# Altium PCB IMX8MMLPD4-CPU2_FULLY_PREPLACED_FANOUT.PcbDoc (part 2 of 3)
Units mil, origin at the board's own origin, x right, y up, seen from the top; angles counter-clockwise.
Board outline 2729.93 x 2000.03 mil, 8 copper layers (L1_PS, L2_GND_1, L3_IN1, L4_GND_2, L5_PWR_1, L6_PWR_2, L7_GND_3, L8_SS), stack 46.1 mil thick; 228 components, 321 nets, 1593 pads, 372 vias.
Unrouted connection lines stored in the file: 857.
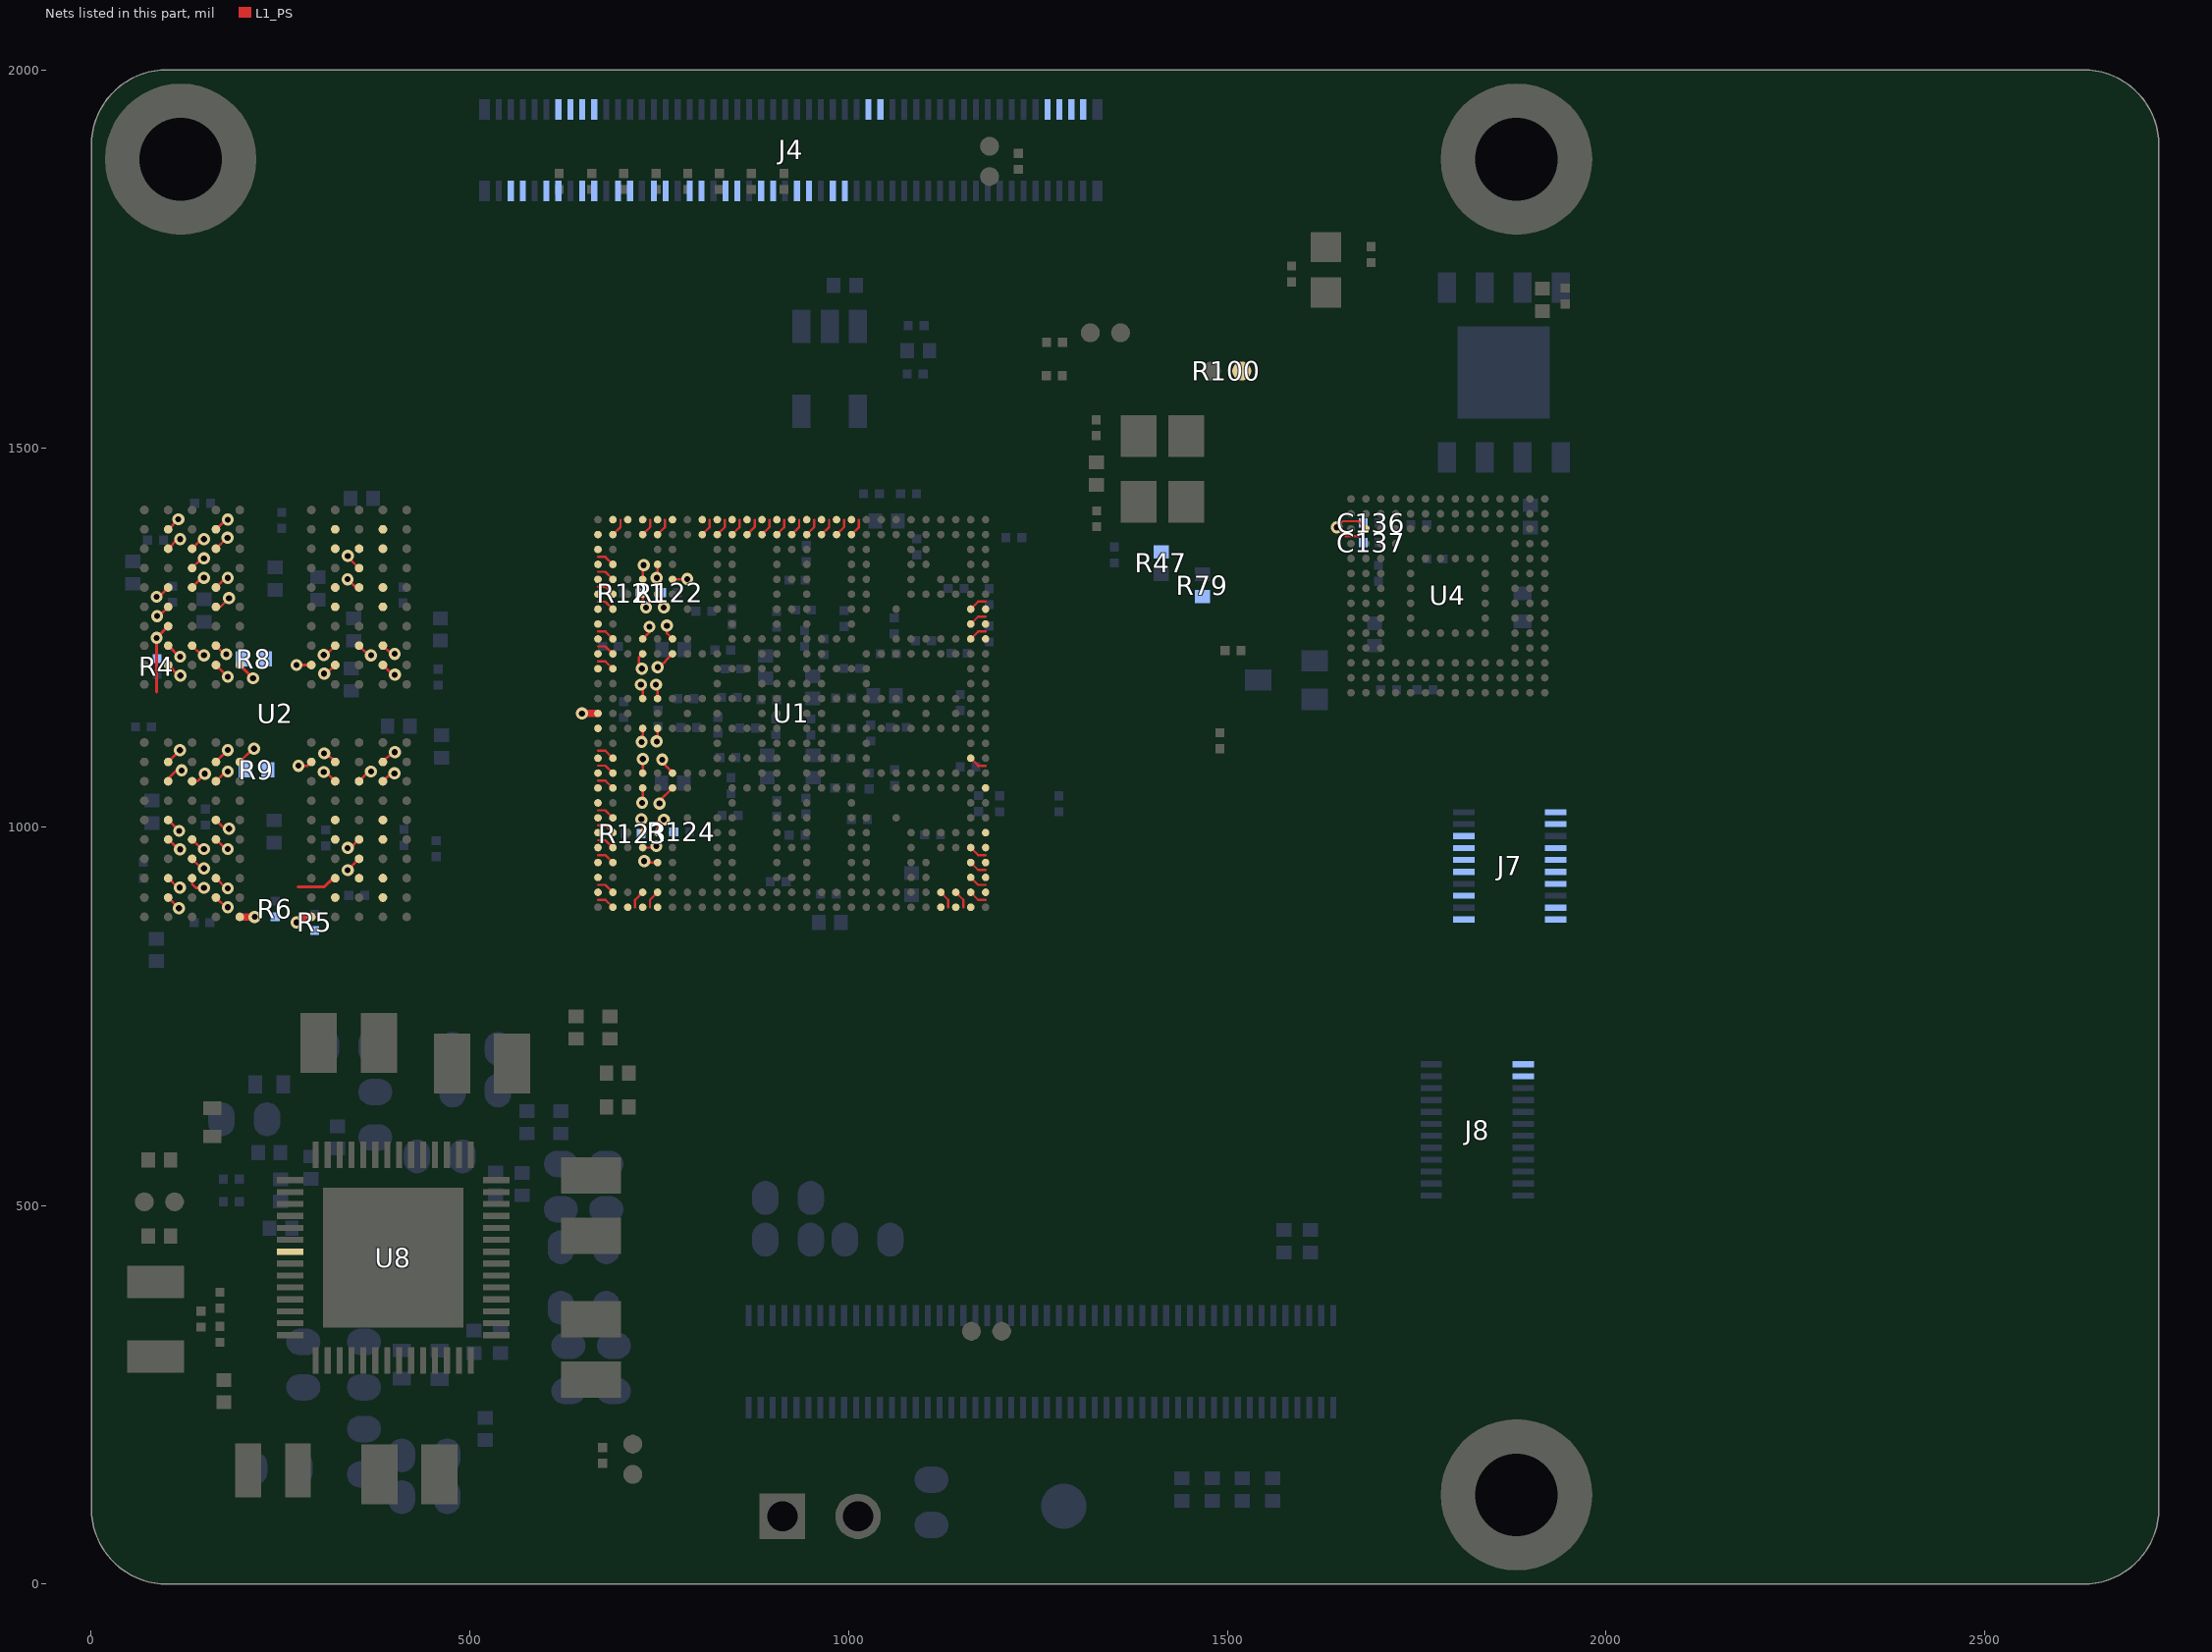
[diagram p4: the nets of this part, all layers, seen from the top]

## Footprints (in the part's own frame and the unit in brackets; to place one, negate y for a bottom-side part, rotate by r counter-clockwise, add the part's x,y. Pads: shape width x height; smd on the part's side, far side on the other; paste and mask are expansions set on the pad) (continued)
con100_0p4_22p8x3p1_sm [mil] "CON100_0P4_22P8X3P1_SM"
  rect 8x28 smd: 1(-385.83,-60.63) 2(-385.83,60.63) 3(-370.08,-60.63) 4(-370.08,60.63) 5(-354.33,-60.63) 6(-354.33,60.63) 7(-338.58,-60.63) 8(-338.58,60.63) 9(-322.83,-60.63) 10(-322.83,60.63) 11(-307.09,-60.63) 12(-307.09,60.63) 13(-291.34,-60.63) 14(-291.34,60.63) 15(-275.59,-60.63) 16(-275.59,60.63) 17(-259.84,-60.63) 18(-259.84,60.63) 19(-244.09,-60.63) 20(-244.09,60.63) 21(-228.35,-60.63) 22(-228.35,60.63) 23(-212.6,-60.63) 24(-212.6,60.63) 25(-196.85,-60.63) 26(-196.85,60.63) 27(-181.1,-60.63) 28(-181.1,60.63) 29(-165.35,-60.63) 30(-165.35,60.63) 31(-149.61,-60.63) 32(-149.61,60.63) 33(-133.86,-60.63) 34(-133.86,60.63) 35(-118.11,-60.63) 36(-118.11,60.63) 37(-102.36,-60.63) 38(-102.36,60.63) 39(-86.61,-60.63) 40(-86.61,60.63) 41(-70.87,-60.63) 42(-70.87,60.63) 43(-55.12,-60.63) 44(-55.12,60.63) 45(-39.37,-60.63) 46(-39.37,60.63) 47(-23.62,-60.63) 48(-23.62,60.63) 49(-7.87,-60.63) 50(-7.87,60.63) 51(7.87,-60.63) 52(7.87,60.63) 53(23.62,-60.63) 54(23.62,60.63) 55(39.37,-60.63) 56(39.37,60.63) 57(55.12,-60.63) 58(55.12,60.63) 59(70.87,-60.63) 60(70.87,60.63) 61(86.61,-60.63) 62(86.61,60.63) 63(102.36,-60.63) 64(102.36,60.63) 65(118.11,-60.63) 66(118.11,60.63) 67(133.86,-60.63) 68(133.86,60.63) 69(149.61,-60.63) 70(149.61,60.63) 71(165.35,-60.63) 72(165.35,60.63) 73(181.1,-60.63) 74(181.1,60.63) 75(196.85,-60.63) 76(196.85,60.63) 77(212.6,-60.63) 78(212.6,60.63) 79(228.35,-60.63) 80(228.35,60.63) 81(244.09,-60.63) 82(244.09,60.63) 83(259.84,-60.63) 84(259.84,60.63) 85(275.59,-60.63) 86(275.59,60.63) 87(291.34,-60.63) 88(291.34,60.63) 89(307.09,-60.63) 90(307.09,60.63) 91(322.83,-60.63) 92(322.83,60.63) 93(338.58,-60.63) 94(338.58,60.63) 95(354.33,-60.63) 96(354.33,60.63) 97(370.08,-60.63) 98(370.08,60.63) 99(385.83,-60.63) 100(385.83,60.63)
  L1_PS keep-out region: -122.11,46.63 -122.11,29.53 -114.11,29.53 -114.11,46.63
  L1_PS keep-out region: -106.36,46.63 -106.36,29.53 -98.36,29.53 -98.36,46.63
  L1_PS keep-out region: -90.61,46.63 -90.61,29.53 -82.61,29.53 -82.61,46.63
  L1_PS keep-out region: -74.87,46.63 -74.87,29.53 -66.87,29.53 -66.87,46.63
  L1_PS keep-out region: -59.12,46.63 -59.12,29.53 -51.12,29.53 -51.12,46.63
  L1_PS keep-out region: -43.37,46.63 -43.37,29.53 -35.37,29.53 -35.37,46.63
  L1_PS keep-out region: -27.62,46.63 -27.62,29.53 -19.62,29.53 -19.62,46.63
  L1_PS keep-out region: -11.87,46.63 -11.87,29.53 -3.87,29.53 -3.87,46.63
  L1_PS keep-out region: 3.87,46.63 3.87,29.53 11.87,29.53 11.87,46.63
  L1_PS keep-out region: 19.62,46.63 19.62,29.53 27.62,29.53 27.62,46.63
  L1_PS keep-out region: 35.37,46.63 35.37,29.53 43.37,29.53 43.37,46.63
  L1_PS keep-out region: 51.12,46.63 51.12,29.53 59.12,29.53 59.12,46.63
  L1_PS keep-out region: 66.87,46.63 66.87,29.53 74.87,29.53 74.87,46.63
  L1_PS keep-out region: 82.61,46.63 82.61,29.53 90.61,29.53 90.61,46.63
  L1_PS keep-out region: 114.11,46.63 114.11,29.53 122.11,29.53 122.11,46.63
  L1_PS keep-out region: 98.36,46.63 98.36,29.53 106.36,29.53 106.36,46.63
  L1_PS keep-out region: 129.86,46.63 129.86,29.53 137.86,29.53 137.86,46.63
  L1_PS keep-out region: 145.61,46.63 145.61,29.53 153.61,29.53 153.61,46.63
  L1_PS keep-out region: 177.1,46.63 177.1,29.53 185.1,29.53 185.1,46.63
  L1_PS keep-out region: 161.35,46.63 161.35,29.53 169.35,29.53 169.35,46.63
  L1_PS keep-out region: 192.85,46.63 192.85,29.53 200.85,29.53 200.85,46.63
  L1_PS keep-out region: 208.6,46.63 208.6,29.53 216.6,29.53 216.6,46.63
  L1_PS keep-out region: 224.35,46.63 224.35,29.53 232.35,29.53 232.35,46.63
  L1_PS keep-out region: -311.09,-29.53 -311.09,-46.63 -303.09,-46.63 -303.09,-29.53
  L1_PS keep-out region: -311.09,46.63 -311.09,29.53 -303.09,29.53 -303.09,46.63
  L1_PS keep-out region: -295.34,-29.53 -295.34,-46.63 -287.34,-46.63 -287.34,-29.53
  L1_PS keep-out region: -295.34,46.63 -295.34,29.53 -287.34,29.53 -287.34,46.63
  L1_PS keep-out region: -279.59,-29.53 -279.59,-46.63 -271.59,-46.63 -271.59,-29.53
  L1_PS keep-out region: -279.59,46.63 -279.59,29.53 -271.59,29.53 -271.59,46.63
  L1_PS keep-out region: -263.84,-29.53 -263.84,-46.63 -255.84,-46.63 -255.84,-29.53
  L1_PS keep-out region: -248.09,46.63 -248.09,29.53 -240.09,29.53 -240.09,46.63
  L1_PS keep-out region: -263.84,46.63 -263.84,29.53 -255.84,29.53 -255.84,46.63
  L1_PS keep-out region: -232.35,46.63 -232.35,29.53 -224.35,29.53 -224.35,46.63
  L1_PS keep-out region: -216.6,46.63 -216.6,29.53 -208.6,29.53 -208.6,46.63
  L1_PS keep-out region: -185.1,46.63 -185.1,29.53 -177.1,29.53 -177.1,46.63
  L1_PS keep-out region: -200.85,46.63 -200.85,29.53 -192.85,29.53 -192.85,46.63
  L1_PS keep-out region: -169.35,46.63 -169.35,29.53 -161.35,29.53 -161.35,46.63
  L1_PS keep-out region: -153.61,46.63 -153.61,29.53 -145.61,29.53 -145.61,46.63
  L1_PS keep-out region: -137.86,46.63 -137.86,29.53 -129.86,29.53 -129.86,46.63
  L1_PS keep-out region: 240.09,46.63 240.09,29.53 248.09,29.53 248.09,46.63
  L1_PS keep-out region: 255.84,46.63 255.84,29.53 263.84,29.53 263.84,46.63
  L1_PS keep-out region: 271.59,46.63 271.59,29.53 279.59,29.53 279.59,46.63
  L1_PS keep-out region: 287.34,46.63 287.34,29.53 295.34,29.53 295.34,46.63
  L1_PS keep-out region: 303.09,46.63 303.09,29.53 311.09,29.53 311.09,46.63
  L1_PS keep-out region: -374.08,46.63 -374.08,29.53 -366.08,29.53 -366.08,46.63
  L1_PS keep-out region: -389.83,46.63 -389.83,29.53 -381.83,29.53 -381.83,46.63
  L1_PS keep-out region: -358.33,46.63 -358.33,29.53 -350.33,29.53 -350.33,46.63
  L1_PS keep-out region: -342.58,46.63 -342.58,29.53 -334.58,29.53 -334.58,46.63
  L1_PS keep-out region: -326.83,46.63 -326.83,29.53 -318.83,29.53 -318.83,46.63
  L1_PS keep-out region: 334.58,46.63 334.58,29.53 342.58,29.53 342.58,46.63
  L1_PS keep-out region: 318.83,46.63 318.83,29.53 326.83,29.53 326.83,46.63
  L1_PS keep-out region: 350.33,46.63 350.33,29.53 358.33,29.53 358.33,46.63
  L1_PS keep-out region: 366.08,46.63 366.08,29.53 374.08,29.53 374.08,46.63
  L1_PS keep-out region: 381.83,46.63 381.83,29.53 389.83,29.53 389.83,46.63
  L1_PS keep-out region: -374.08,-29.53 -374.08,-46.63 -366.08,-46.63 -366.08,-29.53
  L1_PS keep-out region: -389.83,-29.53 -389.83,-46.63 -381.83,-46.63 -381.83,-29.53
  L1_PS keep-out region: -358.33,-29.53 -358.33,-46.63 -350.33,-46.63 -350.33,-29.53
  L1_PS keep-out region: -326.83,-29.53 -326.83,-46.63 -318.83,-46.63 -318.83,-29.53
  L1_PS keep-out region: -342.58,-29.53 -342.58,-46.63 -334.58,-46.63 -334.58,-29.53
  silkscreen extent -456,-69 456,69, body extent -445,-67 445,67, height 58
dfn8_1p27_6x5mm_3p1 [mil] "DFN8_1P27_6X5MM_3P1"
  rect 40x24 smd: 1(-112.2,75) 2(-112.2,25) 3(-112.2,-25) 4(-112.2,-75) 5(112.2,-75) 6(112.2,-25) 7(112.2,25) 8(112.2,75)
  rect 122x122 smd paste-99999 mask+0: 9(0,0)
  silkscreen extent -127,-107 127,107, body extent -119,-101 121,100, height 31
fbga153_0p5_11p5x13 [mil] "FBGA153_0P5_11P5X13"
  round 10 smd: A1(-127.95,127.95) A2(-108.27,127.95) A3(-88.58,127.95) A4(-68.9,127.95) A5(-49.21,127.95) A6(-29.53,127.95) A7(-9.84,127.95) A8(9.84,127.95) A9(29.53,127.95) A10(49.21,127.95) A11(68.9,127.95) A12(88.58,127.95) A13(108.27,127.95) A14(127.95,127.95) B1(-127.95,108.27) B2(-108.27,108.27) B3(-88.58,108.27) B4(-68.9,108.27) B5(-49.21,108.27) B6(-29.53,108.27) B7(-9.84,108.27) B8(9.84,108.27) B9(29.53,108.27) B10(49.21,108.27) B11(68.9,108.27) B12(88.58,108.27) B13(108.27,108.27) B14(127.95,108.27) C1(-127.95,88.58) C2(-108.27,88.58) C3(-88.58,88.58) C4(-68.9,88.58) C5(-49.21,88.58) C6(-29.53,88.58) C7(-9.84,88.58) C8(9.84,88.58) C9(29.53,88.58) C10(49.21,88.58) C11(68.9,88.58) C12(88.58,88.58) C13(108.27,88.58) C14(127.95,88.58) D1(-127.95,68.9) D2(-108.27,68.9) D3(-88.58,68.9) D4(-68.9,68.9) D12(88.58,68.9) D13(108.27,68.9) D14(127.95,68.9) E1(-127.95,49.21) E2(-108.27,49.21) E3(-88.58,49.21) E5(-49.21,49.21) E6(-29.53,49.21) E7(-9.84,49.21) E8(9.84,49.21) E9(29.53,49.21) E10(49.21,49.21) E12(88.58,49.21) E13(108.27,49.21) E14(127.95,49.21) F1(-127.95,29.53) F2(-108.27,29.53) F3(-88.58,29.53) F5(-49.21,29.53) F10(49.21,29.53) F12(88.58,29.53) F13(108.27,29.53) F14(127.95,29.53) G1(-127.95,9.84) G2(-108.27,9.84) G3(-88.58,9.84) G5(-49.21,9.84) G10(49.21,9.84) G12(88.58,9.84) G13(108.27,9.84) G14(127.95,9.84) H1(-127.95,-9.84) H2(-108.27,-9.84) H3(-88.58,-9.84) H5(-49.21,-9.84) H10(49.21,-9.84) H12(88.58,-9.84) H13(108.27,-9.84) H14(127.95,-9.84) J1(-127.95,-29.53) J2(-108.27,-29.53) J3(-88.58,-29.53) J5(-49.21,-29.53) J10(49.21,-29.53) J12(88.58,-29.53) J13(108.27,-29.53) J14(127.95,-29.53) K1(-127.95,-49.21) K2(-108.27,-49.21) K3(-88.58,-49.21) K5(-49.21,-49.21) K6(-29.53,-49.21) K7(-9.84,-49.21) K8(9.84,-49.21) K9(29.53,-49.21) K10(49.21,-49.21) K12(88.58,-49.21) K13(108.27,-49.21) K14(127.95,-49.21) L1(-127.95,-68.9) L2(-108.27,-68.9) L3(-88.58,-68.9) L12(88.58,-68.9) L13(108.27,-68.9) L14(127.95,-68.9) M1(-127.95,-88.58) M2(-108.27,-88.58) M3(-88.58,-88.58) M4(-68.9,-88.58) M5(-49.21,-88.58) M6(-29.53,-88.58) M7(-9.84,-88.58) M8(9.84,-88.58) M9(29.53,-88.58) M10(49.21,-88.58) M11(68.9,-88.58) M12(88.58,-88.58) M13(108.27,-88.58) M14(127.95,-88.58) N1(-127.95,-108.27) N2(-108.27,-108.27) N3(-88.58,-108.27) N4(-68.9,-108.27) N5(-49.21,-108.27) N6(-29.53,-108.27) N7(-9.84,-108.27) N8(9.84,-108.27) N9(29.53,-108.27) N10(49.21,-108.27) N11(68.9,-108.27) N12(88.58,-108.27) N13(108.27,-108.27) N14(127.95,-108.27) P1(-127.95,-127.95) P2(-108.27,-127.95) P3(-88.58,-127.95) P4(-68.9,-127.95) P5(-49.21,-127.95) P6(-29.53,-127.95) P7(-9.84,-127.95) P8(9.84,-127.95) P9(29.53,-127.95) P10(49.21,-127.95) P11(68.9,-127.95) P12(88.58,-127.95) P13(108.27,-127.95) P14(127.95,-127.95)
  silkscreen extent -266,-265 235,295, body extent -226,-256 226,256, height 36
GNDPOINT256 [mil] "GNDPOINT256"
  round 200 hole 109: 1(0,0)
HDR_1X2 [mil] "HDR_1X2"
  rect 60x60 / inner round 60 / far side rect 60x60 hole 40: 1(0,0)
  round 60 hole 40: 2(0,-100)
  L8_SS keep-out region: -30,-35 -30,-65 30,-65 30,-35
  silkscreen extent -57,-157 57,57, body extent -51,-152 49,48, height 330
hvqfn56_0p4_7x7_ep4p7mm [mil] "HVQFN56_0P4_7X7_EP4P7MM"
  rect 35x8 smd: 1(-135.83,102.36) 2(-135.83,86.61) 3(-135.83,70.87) 4(-135.83,55.12) 5(-135.83,39.37) 6(-135.83,23.62) 7(-135.83,7.87) 8(-135.83,-7.87) 9(-135.83,-23.62) 10(-135.83,-39.37) 11(-135.83,-55.12) 12(-135.83,-70.87) 13(-135.83,-86.61) 14(-135.83,-102.36) 29(135.83,-102.36) 30(135.83,-86.61) 31(135.83,-70.87) 32(135.83,-55.12) 33(135.83,-39.37) 34(135.83,-23.62) 35(135.83,-7.87) 36(135.83,7.87) 37(135.83,23.62) 38(135.83,39.37) 39(135.83,55.12) 40(135.83,70.87) 41(135.83,86.61) 42(135.83,102.36)
  rect 8x35 smd: 15(-102.36,-135.83) 16(-86.61,-135.83) 17(-70.87,-135.83) 18(-55.12,-135.83) 19(-39.37,-135.83) 20(-23.62,-135.83) 21(-7.87,-135.83) 22(7.87,-135.83) 23(23.62,-135.83) 24(39.37,-135.83) 25(55.12,-135.83) 26(70.87,-135.83) 27(86.61,-135.83) 28(102.36,-135.83) 43(102.36,135.83) 44(86.61,135.83) 45(70.87,135.83) 46(55.12,135.83) 47(39.37,135.83) 48(23.62,135.83) 49(7.87,135.83) 50(-7.87,135.83) 51(-23.62,135.83) 52(-39.37,135.83) 53(-55.12,135.83) 54(-70.87,135.83) 55(-86.61,135.83) 56(-102.36,135.83)
  rect 185x185 smd paste-99999: 57(0,0)
  silkscreen extent -145,-145 145,145, body extent -138,-138 138,138, height 33
IND_2016A [mil] "IND_2016A"
  rect 34x71 smd: 1(-32.87,-0.08) 2(32.87,-0.08)
  silkscreen extent -45,-42 45,43, body extent -39,-24 39,24, height 37
ind_sph2520 [mil] "IND_SPH2520"
  rect 48x79 smd: 1(-39.75,0) 2(39.75,0)
  silkscreen extent -55,-50 52,50, body extent -49,-39 49,39, height 87
LED_0603 [mil] "LED_0603"
  rect 40x40 smd: A(-30,0) C(30,0)
  silkscreen extent -57,-95 57,27, body extent -33,-18 33,18, height 35
RC0402_25 [mil] "RC0402_25"
  round 25 smd: 1(-20,0) 2(20,0)
  L1_PS keep-out region: 5,4 5,-4 5,-6.07 2.07,-9 -2.07,-9 -5,-6.07 -5,-4 -5,-4 -5,4 -5,6.07 -2.07,9 2.07,9 5,6.07 5,4
  body extent -23,-11 23,11, height 16
sc70_3 [mil] "SC70_3"
  rect 28x35 smd: 1(-25.5,-37.47) 2(25.5,-37.47) 3(0,37.47)
  silkscreen extent -51,-34 51,34, body extent -41,-45 41,45, height 39
sot23-5 [mil] "SOT23-5"
  rect 24x44 smd: 1(-37.4,-56.1) 2(0,-56.1) 3(37.4,-56.1) 4(37.4,56.1) 5(-37.4,56.1)
  silkscreen extent -69,-41 69,41, body extent -59,-55 59,55, height 46
UL_BOX [mil] "UL_BOX"
  silkscreen extent 0,0 700,200
XTAL2-3P2X1P5-SM [mil] "XTAL2-3P2X1P5-SM"
  rect 43x75 smd: 1(-49.21,0.02) 2(49.21,0.02)
  silkscreen extent -82,-48 82,48, body extent -63,-30 63,30, height 35
xtlosc4_3p2x2p5mm_sm [mil] "XTLOSC4_3P2X2P5MM_SM"
  rect 55x47 smd: 1(-43.29,-31.5) 2(43.33,-31.5) 3(43.33,31.5) 4(-43.29,31.5)
  silkscreen extent -78,-62 78,62, body extent -63,-49 63,49, height 28

## Part data
BH1 BH2 BH3: library part MOUNT_HOLE, "MOUNTING HOLE DRILL 109 PAD 200 PLATED TH NO PART TO ORDER", PCB Footprint=GNDPOINT256, RoHS=Yes
C1 C3 C5 C6 C8 C9 C17 C21 C23 C30 C99 C100 C101 C104 C114 C128 C129 C131 C132 C133 C136 C138 C235 C241 C244 C264 C370 C371 C372 C373 C374 C375 C376 C378 C379 C380 C381 C382 C384 C392 C400: library part CAP_NP, "CAP CER 0.22UF 10V 20% X5R 0201", EIA Case=0201, Temp Range="-55°C ~ 125°C", Tolerance=20%, Voltage=10V, MFG_NAME01="Taiyo Yuden", MFG_PN01=LMK063BJ224MP-F, PCB Footprint=0201_CC, RoHS=Yes
C2 C11 C12 C13: library part CAP_NP, "CAP CER 2.2uF 16V 10% X5R 0402", EIA Case=0402, Temp Range="-55°C ~ 85°C", Tolerance=10%, Voltage=16V, MFG_NAME01=MURATA, MFG_PN01=GRM155R61C225KE44, PCB Footprint=0402_CC, RoHS=Yes
C10 C406 C407: library part CAP_NP, "CAP CER 1.0UF 10V 10% X5R 0402", EIA Case=0402, Voltage=10V, MFG_NAME01="YAGEO AMERICA", MFG_PN01=CC0402KRX5R6BB105, PCB Footprint=0402_CC, RoHS=Yes
C15 C16 C35 C36 C48 C54 C61 C65 C74 C78 C90 C91 C92 C93 C94 C95 C137 C248 C251 C253 C254 C255 C256 C267 C391: library part CAP_NP, "CAP CER 1uF 6.3V 20% X5R 0201", EIA Case=0201, Temp Range="-55°C ~ 125°C", Tolerance=20%, Voltage=6.3V, MFG_NAME01=AVX, MFG_PN01=02016D105MAT2A, PCB Footprint=0201_CC, RoHS=Yes
C20 C33 C55 C88 C89 C105 C106 C108 C109 C110 C111 C112 C113 C115 C117 C118 C119 C130 C139 C247 C265 C266: library part CAP_NP, "CAP CER 10UF 6.3V 20% X5R 0402", EIA Case=0402, Temp Range="-55°C ~ 125°C", Tolerance=20%, Voltage=6.3V, MFG_NAME01="SAMSUNG ELECTRO MECHANICS", MFG_PN01=CL05A106MQ5NUNC, PCB Footprint=0402_cc_nsp, RoHS=Yes
C123 C124: library part CAP_NP, "CAP CER 12PF 25V 5% C0G AEC-Q200 0201", EIA Case=0201, Temp Range="-55°C ~ 125°C", Tolerance=5%, Voltage=25V, MFG_NAME01=TDK, MFG_PN01=CGA1A2C0G1E120J030BA, PCB Footprint=0201_CC, RoHS=Yes
C127 C234 C260: library part CAP_NP, "CAP CER 4.7uF 10V 10% X5R 0402", EIA Case=0402, Temp Range="-55°C ~ 125°C", Tolerance=10%, Voltage=10V, MFG_NAME01="SAMSUNG ELECTRO MECHANICS", MFG_PN01=CL05A475KP5NRNC, RoHS=Yes
  C127: PCB Footprint=cc0402_tol0p15
  C234 C260: PCB Footprint=0402_cc_nsp
C245: library part CAP_NP, "CAP CER 18pF 50V 5% C0G 0201", EIA Case=0201, Temp Range="-55°C ~ 125°C", Tolerance=5%, Voltage=50V, MFG_NAME01=MURATA, MFG_PN01=GRM0335C1H180JA01D, PCB Footprint=0201_CC, RoHS=Yes
C268: library part CAP_NP, "CAP CER 2200PF 16V 10% X7R 0201", EIA Case=0201, Temp Range="-55°C ~ 125°C", Tolerance=20%, Voltage=16V, MFG_NAME01=MURATA, MFG_PN01=GRM033R71C222KA88D, PCB Footprint=0201_CC, RoHS=Yes
C275 C283 C285 C287 C303 C304 C311 C312 C317 C324 C403 C404: library part CAP_NP, "CAP CER 22uF 10V 20% X5R 0603", EIA Case=0603, Tolerance=20%, Voltage=10V, MFG_NAME01=TDK, MFG_PN01=C1608X5R1A226M080AC, PCB Footprint=CC0603_OV, RoHS=Yes
C279 C281 C295 C301 C306 C307 C316 C401 C402: library part CAP_NP, "CAP CER 10.0uF 16V 10% X5R 0603", EIA Case=0603, Temp Range="-55°C ~ 85°C", Tolerance=10%, Voltage=16V, MFG_NAME01=MURATA, MFG_PN01=GRM188R61C106KAALD, PCB Footprint=CC0603_OV, RoHS=Yes
C298 C299: library part CAP_NP, "CAP CER 18pF 50V 5% C0G 0201", EIA Case=0201, Tolerance=5%, Voltage=50V, MFG_NAME01=MURATA, MFG_PN01=GRM0335C1H180JA01D, PCB Footprint=0201_CC, RoHS=Yes
C323 C360 C363 C410: library part CAP_NP, "CAP CER 4.7uF 10V 10% X5R 0402", EIA Case=0402, Tolerance=10%, Voltage=10V, MFG_NAME01="SAMSUNG ELECTRO MECHANICS", MFG_PN01=CL05A475KP5NRNC, PCB Footprint=cc0402_tol0p15, RoHS=Yes
C333 C337 C408: library part CAP_NP, "CAP CER 1uF 6.3V 20% X5R 0201", EIA Case=0201, Tolerance=20%, Voltage=6.3V, MFG_NAME01=AVX, MFG_PN01=02016D105MAT2A, PCB Footprint=0201_CC, RoHS=Yes
C365: library part CAP_NP, "CAP CER 1.0UF 16V 10% X5R 0603", EIA Case=0603, Tolerance=10%, Voltage=16V, MFG_NAME01=TDK, MFG_PN01=C1608X5R1C105K, PCB Footprint=CC0603_OV, RoHS=Yes
C393 C394: library part CAP_NP, "CAP CER 0.22UF 10V 20% X5R 0201", EIA Case=0201, Tolerance=20%, Voltage=10V, MFG_NAME01="Taiyo Yuden", MFG_PN01=LMK063BJ224MP-F, PCB Footprint=0201_CC, RoHS=Yes
C405: library part CAP_NP, "CAP CER 2.2uF 10V 10% X5R 0402", EIA Case=0402, Temp Range="-55°C ~ 125°C", Tolerance=10%, Voltage=10V, MFG_NAME01=TDK, MFG_PN01=C1005X5R1A225K, PCB Footprint=0402_CC, RoHS=Yes
D1: library part LED, "LED GRN SGL 25MA SMT 0603", EIA Case=0603, Voltage=2V, MFG_NAME01=DIALIGHT, MFG_PN01=598-8070-107F, PCB Footprint=LED_0603, RoHS=Yes
J4: library part HDR_2X50_M, "CON 2X50 PLUG SHRD SMT 0.4MM SP 51H AU", Temp Range="-35°C ~ 85°C", MFG_NAME01=HIROSE, MFG_PN01=DF40C-100DP-0.4V(51), PCB Footprint=con100_0p4_21p7x2p05_sm, RoHS=Yes, System=Connector
J5: library part HDR_2X50_M, "CON 2X50 SKT SHRD SMT 0.4MM SP 65H AU", Temp Range="-35°C ~ 85°C", MFG_NAME01=HIROSE, MFG_PN01=DF40C-100DS-0.4V(51), PCB Footprint=con100_0p4_22p8x3p1_sm, RoHS=Yes, System=Connector
J6: library part CONN_HDR_2X1, "HDR 1X2 TH 100MIL SP 339H AU 98L", Temp Range="-55°C ~ 155°C", MFG_NAME01=SAMTEC, MFG_PN01=TSW-102-07-G-S, PCB Footprint=HDR_1X2, RoHS=Yes
J7: library part CONN_HDR_10X2, "CON 2X10 SKT SHRD SMT 0.4MM SP 63H AU", Temp Range="-35°C ~ 85°C", MFG_NAME01=HIROSE, MFG_PN01=DF40C-20DS-0.4V(51), PCB Footprint=con20_0p4_6p8x3p1_sm, RoHS=Yes, System=Connector
J8: library part CONN_HDR_12X2, "CON 2X12 SKT SHRD SMT 0.4MM SP 65H AU", MFG_NAME01=HIROSE, MFG_PN01=DF40C-24DS-0.4V(51), PCB Footprint=con24_0p4_7p6x3p08_sm, RoHS=Yes, System=Connector
L5 L6 L10 L15: library part INDUCTOR, "IND PWR 0.47uH@1MHZ 4.7A 20% SMT", EIA Case="2520 (Metric)", Temp Range="-40°C ~ 125°C", Tolerance=20%, MFG_NAME01="SHENZHEN SUNLORD ELECTRONICS CO., LTD", MFG_PN01=WPN252012ER47MT, PCB Footprint=ind_sph2520, RoHS=Yes
L11: library part INDUCTOR, "IND PWR 1uH@1MHZ 4.2A 20% SMT", EIA Case="2520 (Metric)", Temp Range="-40°C ~125°C", MFG_NAME01="SHENZHEN SUNLORD ELECTRONICS CO., LTD", MFG_PN01=WPN252012H1R0MT, PCB Footprint=ind_sph2520, RoHS=Yes
L13: library part INDUCTOR, "IND WW 0.47uH@1MHz 3.4A 20% 2016", EIA Case="2016 (Metric)", Temp Range="-40°C ~ 85°C", Tolerance=20%, Voltage="20V DC", MFG_NAME01=MURATA, MFG_PN01=1286AS-H-R47M=P2, PCB Footprint=IND_2016A, RoHS=Yes
Q1: library part NMOS_NX3008NBK, "TRAN NMOS SW 30V 350mA AEC-Q101 SC-70", EIA Case=SC70-3, MFG_NAME01=NEXPERIA, MFG_PN01=NX3008NBKW,115, PCB Footprint=sc70_3, RoHS=Yes
QZ2: library part XTAL, "XTAL 32.768KHZ 12.5PF 20PPM 3.2X1.5MM SMT", EIA Case="3215 (Metric)", MFG_NAME01="Abracon Corporation", MFG_PN01=ABS07-32.768KHZ-T, PCB Footprint=XTAL2-3P2X1P5-SM, RoHS=Yes
R4 R18 R23 R121 R122 R123 R124: library part RES, "RES MF 10K 1/20W 5% 0201", EIA Case=0201, Rated Power=1/20W, Temp Range="-55°C ~ 125°C", Tolerance=5%, MFG_NAME01="RALEC ELECTRONIC CORP", MFG_PN01=RTT01103JTH, PCB Footprint=0201_CC, RoHS=Yes
R5: library part RES, "RES MF 240 OHM 1/20W 1% 0201", EIA Case=0201, Rated Power=1/20W, Temp Range="-55°C ~ 125°C", Tolerance=1%, Voltage=25V, MFG_NAME01="YAGEO AMERICA", MFG_PN01=RC0201FR-07240RL, PCB Footprint=0201_CC, RoHS=Yes
R6 R7: library part RES, "RES MF 240 OHM 1/20W 1% 0201", EIA Case=0201, Rated Power=1/20W, Temp Range="-55°C ~ 155°C", Tolerance=1%, Voltage=25V, MFG_NAME01="YAGEO AMERICA", MFG_PN01=RC0201FR-07240RL, PCB Footprint=0201_CC, RoHS=Yes
R8 R9: library part RES, "RES MF 150 OHM 1/16W 1% 0402", EIA Case=0402, Rated Power=1/16W, Tolerance=1%, MFG_NAME01="NIC COMPONENTS CORP", MFG_PN01=NRCL04F1500TRF, PCB Footprint=0402_CC, RoHS=Yes
R10 R11 R12 R13 R14 R15 R16 R17 R133: library part RES, "RES MF 4.7K 1/20W 5% AEC-Q200 0201", EIA Case=0201, Rated Power=1/20W, Temp Range="-55°C ~ 155°C", Tolerance=5%, MFG_NAME01="KOA SPEER", MFG_PN01=RK73B1HTTC472J, PCB Footprint=0201_CC, RoHS=Yes
R20 R21 R102 R103 R135: library part RES, "RES MF 100K 1/20W 1% 0201", EIA Case=0201, Rated Power=1/20W, Temp Range="-55°C ~ 125°C", Tolerance=1%, MFG_NAME01=SKYMOS, MFG_PN01=RC-0201-104FT, PCB Footprint=0201_CC, RoHS=Yes
R26: library part RES, "RES MF 510K 1/16W 5% 0402", EIA Case=0402, Rated Power=1/16W, Tolerance=5%, MFG_NAME01=PANASONIC, MFG_PN01=ERJ-2GEJ514X, PCB Footprint=0402_CC, RoHS=Yes
R28: library part RES, "RES MF 8.2K  1/10W 1% AEC-Q200 0402", EIA Case=0402, Rated Power=1/10W, Temp Range="-55°C ~ 155°C", Tolerance=1%, MFG_NAME01="KOA SPEER", MFG_PN01=RK73H1ETTP8201F, PCB Footprint=0402_CC, RoHS=Yes
R29 R30: library part RES, "RES MF 200 OHM 1/20W 1% 0201", EIA Case=0201, Rated Power=1/20W, Temp Range="-55°C ~ 155°C", Tolerance=1%, Voltage=25V, MFG_NAME01="YAGEO AMERICA", MFG_PN01=RC0201FR-07200RL, PCB Footprint=0201_CC, RoHS=Yes
R37 R47 R71 R72 R75 R76 R79 R95 R97: library part RES, "RES MF 10K 1/16W 5% 0402", EIA Case=0402, Rated Power=1/16W, Tolerance=5%, MFG_NAME01="VISHAY INTERTECHNOLOGY", MFG_PN01=CRCW040210K0JNED, PCB Footprint=0402_CC, RoHS=Yes
R48 R51 R52 R54 R111 R114 R140 R141 R142 R143 R144 R145 R146: library part RES, "RES MF ZERO OHM 1/16W 5% 0402", EIA Case=0402, Rated Power=1/16W, Temp Range="-55°C ~ 125°C", Tolerance=5%, MFG_NAME01=ROHM, MFG_PN01=MCR01MZPJ000, PCB Footprint=0402_CC, RoHS=Yes
R55 R100 R113 R116 R127 R134: library part RES, "RES MF ZERO OHM 1/16W 5% 0402", EIA Case=0402, Rated Power=1/16W, Tolerance=5%, MFG_NAME01=ROHM, MFG_PN01=MCR01MZPJ000, PCB Footprint=RC0402_25, RoHS=Yes
R57: library part RES, "RES MF 1.0M 1/20W 5% AEC-Q200 0201", EIA Case=0201, Rated Power=1/20W, Temp Range="-55°C ~ 125°C", Tolerance=5%, Voltage=25V, MFG_NAME01=PANASONIC, MFG_PN01=ERJ-1GNJ105C, PCB Footprint=0201_CC, RoHS=Yes
R106: library part RES, "RES MF 100K 1/20W 1% 0201", EIA Case=0201, Rated Power=1/20W, Tolerance=1%, MFG_NAME01=SKYMOS, MFG_PN01=RC-0201-104FT, PCB Footprint=0201_CC, RoHS=Yes
R108 R109: library part RES, "RES MF 30K 1/20W 1% 0201", EIA Case=0201, Rated Power=1/20W, Temp Range="-55°C ~ 155°C", Tolerance=1%, Voltage=25V, MFG_NAME01="YAGEO AMERICA", MFG_PN01=RC0201FR-0730KL, PCB Footprint=0201_CC, RoHS=Yes
R117 R118 R119 R120: library part RES, "RES MF 10K 1/20W 5% 0201", EIA Case=0201, Rated Power=1/20W, Tolerance=5%, MFG_NAME01="RALEC ELECTRONIC CORP", MFG_PN01=RTT01103JTH, PCB Footprint=0201_CC, RoHS=Yes
R125: library part RES, "RES MF 1.0K 1/20W 5% 0201", EIA Case=0201, Rated Power=1/20W, Temp Range="-55°C ~ 155°C", Tolerance=5%, Voltage=25V, MFG_NAME01="WALSIN TECHNOLOGY CORP.", MFG_PN01="WR02X102 JAL", PCB Footprint=0201_CC, RoHS=Yes
U1: library part MIMX8MM_BGA486P, "IC CPU QUAD CORTEX A53+M4 1.8GHZ BGA486", JEDEC Case=BGA486, MFG_NAME01="NXP SEMICONDUCTORS", MFG_PN01=MIMX8MM6DVTLZAA, PCB Footprint=bga486_0p5_14x14, RoHS=Yes
U2: library part MT53D512M32D2DS_BGA200P, "IC MEM MOBILE LPDDR4 DUAL-CH SINGLE RANK DISCRETE 512MbX32 1.1V  WFBGA200", JEDEC Case=BGA200, Temp Range="-25°C ~ 85°C", MFG_NAME01=MICRON, MFG_PN01="MT53E512M32D2NP-046 WT:F", PCB Footprint=bga200_0p65x0p8_10p1x14p6, RoHS=Yes
U4: library part SDINBDG4-16G_VFBGA_153P, "IC MEM NAND FLASH 32GB eMMC 5.1 CTLR 2.7-3.6V FBGA153", EIA Case="11.5 mm x 13 mm x 1 mm", JEDEC Case=BGA153, Temp Range="-25°C ~ 85°C", Voltage=2.7-3.6V, MFG_NAME01=SanDisk, MFG_PN01=SDINBDG4-32G-I1, PCB Footprint=fbga153_0p5_11p5x13, RoHS=YES
U5: library part MT25QL256ABA1EW9_9P, "IC MEM FLASH SERIAL NOR 256MBIT 166MHZ 1.7-2V WPDFN8", Voltage=1.7-2V, MFG_NAME01=MICRON, MFG_PN01=MT25QU256ABA1EW7-0SIT, PCB Footprint=dfn8_1p27_6x5mm_3p1, RoHS=Yes
U8: library part PCA9450_HVQFN56P_A, "IC POWER MANAGEMENT 2.7-5.5V HVQFN56", JEDEC Case=QFN56, Temp Range="-40°C ~ 105°C", Voltage=2.7-5.5V, MFG_NAME01="NXP SEMICONDUCTORS", MFG_PN01=PCA9450AAHN, PCB Footprint=hvqfn56_0p4_7x7_ep4p7mm, RoHS=Yes
U10: library part NCV571_5P, "IC LIN VREG LDO 1.2V 150mA 1.5-5.5V SOT23-5", EIA Case=SOT-23, Temp Range="-40°C ~ 125°C", MFG_NAME01="ST MICROELECTRONICS", MFG_PN01=LD39015M12R, PCB Footprint=sot23-5, RoHS=Yes
Y1: library part XTAL_13Y, "XTAL 24MHZ 9pF -- SMT 3.2X2.5MM", EIA Case="3225 (Metric)", MFG_NAME01="EPSON TOYOCOM CORPORATION", MFG_PN01="TSX-3225 24.0000MF15X-AC3", PCB Footprint=xtlosc4_3p2x2p5mm_sm, RoHS=Yes

## Free pads (board coordinates)
  round 60 smd far side: ""(1284,103)

## Via types
v1: diameter 16, hole 8, L1_PS to L8_SS, tented both sides, 325 vias
v2: diameter 16, hole 8, L1_PS to L8_SS, tented top, 47 vias

## Nets (pads, with @x,y where several pads share a name; then routed paths per layer and width w, separated by ;. In a path a pad name is that pad's centre, name@x,y a point inside that pad or via, vN(x,y) a via of type N, cw(c..) or ccw(c..) an arc to the next point about the centre after c; other vN are vias at no path point)
BOOT_MODE0: J4.98 R47.1 U1.G26 | length 23.8
  L1_PS w3: U1.G26@1161.11,1287.7 1171.09,1297.68 1180.8,1297.68
BOOT_MODE1: J4.100 R79.1 U1.G27
BT_WAKE_DEV: J8.1 U1.U26 | length 23.8
  L1_PS w3: U1.U26@1161.11,1090.84 1171.09,1080.86 1180.8,1080.86
BT_WAKE_HOST: J8.3 U1.W27
CLK_32K_OUT: R100.1 U8.7
CLKIN1: J4.94 U1.H27
CLKIN2: J4.96 U1.J27
CLKOUT1: J4.64 U1.H26 | length 23.7
  L1_PS w3: U1.H26@1161.11,1268.01 1170.81,1277.71 1180.8,1277.71
CLKOUT2: J4.66 U1.J26 | length 23.8
  L1_PS w3: U1.J26@1161.11,1248.32 1171.1,1258.31 1180.8,1258.31
CSI_CK_N: J4.45 U1.A16
CSI_CK_P: J4.47 U1.B16 | length 23.8
  L1_PS w3: U1.B16@964.26,1386.12 974.25,1396.1 974.25,1405.81
CSI_D0_N: J4.33 U1.A14
CSI_D0_P: J4.35 U1.B14 | length 23.7
  L1_PS w3: U1.B14@924.89,1386.12 934.59,1395.82 934.59,1405.81
CSI_D1_N: J4.39 U1.A15
CSI_D1_P: J4.41 U1.B15 | length 23.8
  L1_PS w3: U1.B15@944.57,1386.12 954.57,1396.11 954.57,1405.81
CSI_D2_N: J4.51 U1.A17
CSI_D2_P: J4.53 U1.B17 | length 23.8
  L1_PS w3: U1.B17@983.95,1386.12 993.93,1396.1 993.93,1405.81
CSI_D3_N: J4.57 U1.A18
CSI_D3_P: J4.59 U1.B18 | length 23.8
  L1_PS w3: U1.B18@1003.63,1386.12 1013.62,1396.11 1013.62,1405.81
DRAM_NRESET: R4.2 U1.R1 U2.T11 | length 92.9
  L1_PS w4.1: 86.18,1178.54 v2(86.18,1249.64) U2.T11@101.6,1265.06
DRAM_VREF: U1.P1 | length 21.2
  L1_PS w10: v1(647.8,1149.9) U1.P1@668.98,1149.9
DRAM_ZQ0: R5.2 U2.A5 | length 22.7
  L1_PS w10: v1(270.89,873.9) 278.19,881.2 U2.A5@290.57,881.2
DRAM_ZQ1: R6.2 U2.A8 | length 19.7
  L1_PS w10: U2.A8@196.09,881.2 v2(215.77,881.2)
DRAMA_CA0: U1.J6 U2.R2 | length 40.5
  L1_PS w3.2: U2.R2@385.06,1239.47 395.89,1228.64 v2(400.53,1228.64)
  L1_PS w3.3: v1(760.04,1265.84) 760.04,1255.69 U1.J6@767.41,1248.32
DRAMA_CA1: U1.K6 U2.P2 | length 47.9
  L1_PS w3.2: U2.P2@385.06,1213.88 397.86,1201.08 v2(400.81,1201.08)
  L1_PS w3.3: v1(747.89,1210.9) 749.67,1210.9 U1.K6@767.41,1228.64
DRAMA_CA2: U1.E4 U2.R9 | length 37.6
  L1_PS w3.3: U2.R9@164.59,1239.47 175.87,1228.19 v1(178.3,1228.19) ; U1.E4@728.04,1327.06 728.04,1344.39 v1(729.37,1345.72)
DRAMA_CA3: U1.D5 U2.R10 | length 39.4
  L1_PS w3.3: U2.R10@133.09,1239.47 145.89,1226.67 v2(148.84,1226.67) ; v1(746.53,1328.94) 747.73,1330.14 U1.D5@747.73,1346.75
DRAMA_CA4: U1.N4 U2.R11 | length 41.1
  L1_PS w3.3: v1(725.62,1187.9) 727.96,1185.56 727.96,1169.66 U1.N4@728.04,1169.58
  L1_PS w3.5: U2.R11@101.6,1239.47 116.15,1224.92 v1(117.36,1224.92)
DRAMA_CA5: U1.N5 U2.P11 | length 41.1
  L1_PS w3: v1(745.62,1187.9) 747.73,1185.79 U1.N5@747.73,1169.58
  L1_PS w3.5: U2.P11@101.6,1213.88 115.66,1199.82 v2(117.72,1199.82)
DRAMA_CK_C: R8.2 U1.L1 U2.P9 | length 22
  L1_PS w3.3: U2.P9@164.59,1213.88 v1(180.13,1198.34)
DRAMA_CK_T: R8.1 U1.L2 U2.P8 | length 48.6
  L1_PS w3: 668.98,1218.8 678.82,1218.8 U1.L2@688.67,1208.96
  L1_PS w3.5: U2.P8@196.09,1213.88 v1(213.64,1196.33)
DRAMA_CKE0: R121.2 U1.F4 U2.P4 | length 38.7
  L1_PS w3: 728.04,1300.44 728.04,1294.39 v1(732.53,1289.9)
  L1_PS w3.3: v1(307.38,1202.51) 310.7,1202.51 U2.P4@322.07,1213.88 ; 728.04,1300.44 U1.F4@728.04,1307.38
DRAMA_CKE1: R122.2 U1.F5 U2.P5 | length 40.5
  L1_PS w3: 747.73,1302.06 747.73,1298.06 v1(755.89,1289.9)
  L1_PS w3.3: v1(270.89,1213.88) U2.P5@290.57,1213.88 ; 747.73,1302.06 U1.F5@747.73,1307.38
DRAMA_DATA0: U1.A5 U2.AA11 | length 18.8
  L1_PS w3.3: U2.AA11@101.6,1393.01 v2(114.89,1406.3)
DRAMA_DATA1: U1.B5 U2.Y11 | length 44.7
  L1_PS w3: U1.B5@747.73,1386.12 757.42,1395.82 757.42,1405.81
  L1_PS w3.3: U2.Y11@101.6,1367.42 114.39,1380.21 v1(117.34,1380.21)
DRAMA_DATA2: U1.D2 U2.V11 | length 44.3
  L1_PS w3: 668.98,1356.59 678.82,1356.59 U1.D2@688.67,1346.75
  L1_PS w3.3: v1(86.2,1303.93) 89.29,1303.93 U2.V11@101.6,1316.24
DRAMA_DATA3: U1.D1 U2.U11 | length 19.7
  L1_PS w3.3: v1(86.94,1278.52) 89.47,1278.52 U2.U11@101.6,1290.65
DRAMA_DATA4: U1.C1 U2.U9 | length 22.1
  L1_PS w3.3: U2.U9@164.59,1290.65 170.38,1290.65 v2(181.93,1302.2)
DRAMA_DATA5: U1.B1 U2.V9 | length 21
  L1_PS w3.3: U2.V9@164.59,1316.24 177.35,1329 v1(180.33,1329)
DRAMA_DATA6: U1.A3 U2.Y9 | length 21.3
  L1_PS w3.3: U2.Y9@164.59,1367.42 177.93,1380.76 178.75,1380.76 v2(179.89,1381.9)
DRAMA_DATA7: U1.B4 U2.AA9 | length 44.9
  L1_PS w3: U1.B4@728.04,1386.12 738.02,1396.1 738.02,1405.81
  L1_PS w3.3: U2.AA9@164.59,1393.01 177.39,1405.81 v2(180.33,1405.81)
DRAMA_DATA8: U1.F2 U2.AA2 | length 23.8
  L1_PS w3: 668.98,1317.23 678.82,1317.23 U1.F2@688.67,1307.38
DRAMA_DATA9: U1.G2 U2.Y2 | length 23.8
  L1_PS w3: 668.98,1297.55 678.82,1297.55 U1.G2@688.67,1287.7
DRAMA_DATA10: U1.J1 U2.V4
DRAMA_DATA11: U1.J2 U2.V2 | length 23.8
  L1_PS w3: 668.98,1258.17 678.82,1258.17 U1.J2@688.67,1248.32
DRAMA_DATA12: U1.K2 U2.U2 | length 23.8
  L1_PS w3: 668.98,1238.48 678.82,1238.48 U1.K2@688.67,1228.64
DRAMA_DATA13: U1.K1 U2.U4
DRAMA_DATA14: U1.E1 U2.AA4
DRAMA_DATA15: U1.E2 U2.Y4 | length 23.8
  L1_PS w3: 668.98,1336.91 678.82,1336.91 U1.E2@688.67,1327.06
DRAMA_DMI0: U1.A4 U2.Y10 | length 21
  L1_PS w3.3: U2.Y10@133.09,1367.42 145.88,1380.21 v1(148.84,1380.21)
DRAMA_DMI1: U1.F1 U2.Y3
DRAMA_nCS0: U1.K4 U2.R4 | length 51.7
  L1_PS w3.3: v2(307,1227.15) 309.75,1227.15 U2.R4@322.07,1239.47 ; v1@722.89,1212.9 v1(726.89,1208.9) 722.89,1208.9 722.89,1223.49 U1.K4@728.04,1228.64
DRAMA_nCS1: U1.J4 U2.R3 | length 40.7
  L1_PS w3.3: U2.R3@353.57,1239.47 366.37,1226.67 v1(369.31,1226.67) ; U1.J4@728.04,1248.32 736.91,1257.19 v1(736.91,1264.32)
DRAMA_SDQS0_C: U1.B2 U2.V10 | length 44.9
  L1_PS w3: U1.B2@688.67,1386.12 698.65,1396.1 698.65,1405.81
  L1_PS w3.3: U2.V10@133.09,1316.24 145.88,1329.03 v2(148.84,1329.03)
DRAMA_SDQS0_T: U1.A2 U2.W10 | length 21
  L1_PS w3.3: U2.W10@133.09,1341.83 145.88,1354.62 v2(148.84,1354.62)
DRAMA_SDQS1_C: U1.H1 U2.V3 | length 19.7
  L1_PS w3.3: v2(338.39,1327.17) 349.32,1316.24 U2.V3@353.57,1316.24
DRAMA_SDQS1_T: U1.G1 U2.W3 | length 22.2
  L1_PS w3.3: v2(338.61,1357.86) 338.61,1356.79 U2.W3@353.57,1341.83
DRAMB_CA0: U1.W6 U2.H2 | length 47.3
  L1_PS w3.3: U2.H2@385.06,1060.33 395.48,1070.75 v2(400.38,1070.75) ; v1(750.19,1030.9) 750.19,1034.26 U1.W6@767.41,1051.48
DRAMB_CA1: U1.V6 U2.J2 | length 44.4
  L1_PS w3.3: U2.J2@385.06,1085.92 397.86,1098.72 v2(400.81,1098.72) ; v1(753.89,1088.9) 753.89,1085.28 767.41,1071.76 U1.V6@767.41,1071.16
DRAMB_CA2: U1.AC4 U2.H9 | length 39.9
  L1_PS w3: U1.AC4@728.04,972.74 744.23,972.74 v1(746.13,974.64)
  L1_PS w3.3: U2.H9@164.59,1060.33 177.39,1073.13 v1(180.33,1073.13)
DRAMB_CA3: U1.AD5 U2.H10 | length 39.5
  L1_PS w3.3: U2.H10@133.09,1060.33 139.94,1060.33 v2(149.89,1070.28) ; v1(729.98,954.98) 731.91,953.05 U1.AD5@747.73,953.05
DRAMB_CA4: U1.R4 U2.H11 | length 44.4
  L1_PS w3.3: v1(726.52,1112.27) 728.04,1113.79 U1.R4@728.04,1130.22
  L1_PS w3.5: U2.H11@101.6,1060.33 101.6,1063.87 112.4,1074.67 v1(119.36,1074.67)
DRAMB_CA5: U1.R5 U2.J11 | length 39.8
  L1_PS w3: v1(746.52,1112.9) 747.73,1114.11 U1.R5@747.73,1130.22
  L1_PS w3.5: U2.J11@101.6,1085.92 v2(117.13,1101.45)
DRAMB_CK_C: R9.2 U1.U1 U2.J9 | length 22.2
  L1_PS w3.3: U2.J9@164.59,1085.92 v1(180.27,1101.6)
DRAMB_CK_T: R9.1 U1.U2 U2.J8 | length 49.7
  L1_PS w3: 668.98,1100.68 678.82,1100.68 U1.U2@688.67,1090.84
  L1_PS w3.3: U2.J8@196.09,1085.92 213.44,1103.27 v1(214.84,1103.27)
DRAMB_CKE0: R123.2 U1.AB4 U2.J4 | length 37.9
  L1_PS w3.3: v2(307.38,1097.29) 310.7,1097.29 U2.J4@322.07,1085.92 ; v1(726.29,1010.19) 728.04,1008.44 U1.AB4@728.04,992.42
DRAMB_CKE1: R124.2 U1.AB5 U2.J5 | length 42.7
  L1_PS w3.3: v1(273.56,1080.83) 285.48,1080.83 U2.J5@290.57,1085.92 ; U1.AB5@747.73,992.42 747.72,1006.48 751.02,1009.78 v1(755.89,1009.78)
DRAMB_DATA0: U1.AB2 U2.B2 | length 23.8
  L1_PS w3: 668.98,1002.26 678.82,1002.26 U1.AB2@688.67,992.42
DRAMB_DATA1: U1.AA2 U2.C2 | length 23.8
  L1_PS w3: 668.98,1021.94 678.82,1021.94 U1.AA2@688.67,1012.1
DRAMB_DATA2: U1.W1 U2.F2
DRAMB_DATA3: U1.W2 U2.E2 | length 23.8
  L1_PS w3: 668.98,1061.33 678.82,1061.33 U1.W2@688.67,1051.48
DRAMB_DATA4: U1.V2 U2.E4 | length 23.8
  L1_PS w3: 668.98,1081.01 678.82,1081.01 U1.V2@688.67,1071.16
DRAMB_DATA5: U1.V1 U2.F4
DRAMB_DATA6: U1.AC1 U2.B4
DRAMB_DATA7: U1.AC2 U2.C4 | length 77.6
  L1_PS w3: 668.98,982.58 678.82,982.58 U1.AC2@688.67,972.73
  L1_PS w4.1: 273,921 307.99,921 319.37,932.38 U2.C4@322.07,932.38
DRAMB_DATA8: U1.AG5 U2.B11 | length 19.9
  L1_PS w3.3: U2.B11@101.6,906.79 v2(115.69,892.7)
DRAMB_DATA9: U1.AF5 U2.C11 | length 44.3
  L1_PS w3: 737.74,893.99 737.74,903.69 U1.AF5@747.73,913.68
  L1_PS w3.2: U2.C11@101.6,932.38 114.08,919.9 v2(116.89,919.9)
DRAMB_DATA10: U1.AD2 U2.E11 | length 44.7
  L1_PS w3: 668.98,962.9 678.82,962.9 U1.AD2@688.67,953.05
  L1_PS w3.3: U2.E11@101.6,983.56 114.59,970.57 v2(117.17,970.57)
DRAMB_DATA11: U1.AD1 U2.F11 | length 20.4
  L1_PS w3.3: U2.F11@101.6,1009.15 v1(116.02,994.73)
DRAMB_DATA12: U1.AE1 U2.F9 | length 22.1
  L1_PS w3.3: U2.F9@164.59,1009.15 176.14,997.6 v2(181.93,997.6)
DRAMB_DATA13: U1.AF1 U2.E9 | length 21
  L1_PS w3.3: U2.E9@164.59,983.56 177.35,970.8 v1(180.33,970.8)
DRAMB_DATA14: U1.AG3 U2.C9 | length 21.3
  L1_PS w3.3: U2.C9@164.59,932.38 177.93,919.04 v1(180.33,919.04)
DRAMB_DATA15: U1.AF4 U2.B9 | length 44.9
  L1_PS w3: 718.05,893.99 718.05,903.69 U1.AF4@728.04,913.68
  L1_PS w3.3: U2.B9@164.59,906.79 177.39,893.99 v2(180.33,893.99)
DRAMB_DMI0: U1.AB1 U2.C3
DRAMB_DMI1: U1.AG4 U2.C10 | length 25.5
  L1_PS w3.3: U2.C10@133.09,932.38 133.09,924.76 138.26,919.59 v1(148.84,919.59)
DRAMB_nCS0: U1.V4 U2.H4 | length 38.8
  L1_PS w3.3: v2(307,1072.65) 309.75,1072.65 U2.H4@322.07,1060.33 ; U1.V4@728.04,1071.16 728.04,1088.81 728.08,1088.85 728.08,1089.56 v1(728.21,1089.69)
DRAMB_nCS1: U1.W4 U2.H3 | length 41
  L1_PS w3.3: U2.H3@353.57,1060.33 366.37,1073.13 v2(369.31,1073.13) ; v1(727.24,1031.9) 728.04,1032.7 U1.W4@728.04,1051.48
DRAMB_SDQS0_C: U1.Y1 U2.E3 | length 19.7
  L1_PS w3.3: v2(338.58,972.29) 342.3,972.29 U2.E3@353.57,983.56
DRAMB_SDQS0_T: U1.AA1 U2.D3 | length 21.3
  L1_PS w3.3: v2(338.49,943.03) 353.43,957.97 U2.D3@353.57,957.97
DRAMB_SDQS1_C: U1.AF2 U2.E10 | length 44.8
  L1_PS w3: 668.98,923.52 678.82,923.52 U1.AF2@688.67,913.68
  L1_PS w3.3: U2.E10@133.09,983.56 145.88,970.77 v2(148.84,970.77)
DRAMB_SDQS1_T: U1.AG2 U2.D10 | length 44.8
  L1_PS w3: 668.98,903.84 678.82,903.84 U1.AG2@688.67,893.99
  L1_PS w3.3: U2.D10@133.09,957.97 145.88,945.18 v2(148.84,945.18)
DSI_CK_N: J4.15 U1.A11
DSI_CK_P: J4.17 U1.B11 | length 23.8
  L1_PS w3: U1.B11@865.83,1386.12 875.83,1396.11 875.83,1405.81
DSI_D0_N: J4.3 U1.A9
DSI_D0_P: J4.5 U1.B9 | length 23.8
  L1_PS w3: U1.B9@826.47,1386.12 836.45,1396.1 836.45,1405.81
DSI_D1_N: J4.9 U1.A10
DSI_D1_P: J4.11 U1.B10 | length 23.7
  L1_PS w3: U1.B10@846.15,1386.12 855.85,1395.82 855.85,1405.81
DSI_D2_N: J4.21 U1.A12
DSI_D2_P: J4.23 U1.B12 | length 23.8
  L1_PS w3: U1.B12@885.52,1386.12 895.51,1396.1 895.51,1405.81
DSI_D3_N: J4.27 U1.A13
DSI_D3_P: J4.29 U1.B13 | length 23.7
  L1_PS w3: U1.B13@905.21,1386.12 914.91,1395.82 914.91,1405.81
ECSPI2_MISO: J4.16 U1.A8
ECSPI2_MOSI: J4.18 U1.B8 | length 23.7
  L1_PS w3: U1.B8@806.78,1386.12 816.48,1395.82 816.48,1405.81
ECSPI2_SCLK: J4.14 U1.E6 | length 19.6
  L1_PS w3: U1.E6@767.41,1327.06 786.49,1327.06 v1(786.89,1327.46)
ECSPI2_SS0: J4.12 U1.A6
EMMC_VDDIM: C136.1 C137.1 U4.C2 | length 93.4
  L1_PS w3: v1(1644.42,1395.66) 1656.22,1383.86 1672.93,1383.86 U4.C2@1682.91,1393.84 1673.04,1403.71 1652.47,1403.71 v1(1644.42,1395.66)
ENET_MDC: J7.18 U1.AC27
ENET_MDIO: J7.20 U1.AB27
ENET_RD0: J7.8 U1.AE27
ENET_RD1: J7.10 U1.AD27
ENET_RD2: J7.12 U1.AD26 | length 23.8
  L1_PS w3: U1.AD26@1161.11,953.05 1171.02,943.14 1180.8,943.14
ENET_RD3: J7.14 U1.AC26 | length 23.8
  L1_PS w3: U1.AC26@1161.11,972.74 1171.1,962.75 1180.8,962.75
ENET_RX_CTL: J7.2 U1.AF27
ENET_RXC: J7.4 U1.AE26 | length 23.8
  L1_PS w3: U1.AE26@1161.11,933.36 1170.92,923.55 1180.8,923.55
ENET_TD0: J7.9 U1.AG26
ENET_TD1: J7.11 U1.AF26 | length 23.8
  L1_PS w3: U1.AF26@1161.11,913.68 1170.94,903.85 1180.8,903.85
ENET_TD2: J7.13 U1.AG25
ENET_TD3: J7.15 U1.AF25 | length 23.8
  L1_PS w3: U1.AF25@1141.43,913.68 1151.41,903.7 1151.41,893.99
ENET_TX_CTL: J7.1 U1.AF24 | length 23.8
  L1_PS w3: U1.AF24@1121.54,913.68 1131.52,903.7 1131.52,893.99
ENET_TXC: J7.5 U1.AG24

## Text inside footprints (layer, text, board x,y; h text height)
BH1: Bottom Designator "1" at 1878.85,1881.82 h10; Top Pin Number "1" at 1879.47,1871.82 h20
BH2: Bottom Designator "1" at 1878.85,118.04 h10; Top Pin Number "1" at 1879.47,108.04 h20
BH3: Bottom Designator "1" at 115.07,1881.82 h10; Top Pin Number "1" at 115.69,1871.82 h20
C20: Bottom Pin Number "2" at 890.07,1206.26 h25 r270; Bottom Pin Number "1" at 890.07,1235.78 h25 r270
C33: Bottom Pin Number "2" at 953.1,1084.7 h25 r90; Bottom Pin Number "1" at 953.1,1055.18 h25 r90
C55: Bottom Pin Number "2" at 892.54,1084.69 h25 r90; Bottom Pin Number "1" at 892.54,1055.17 h25 r90
C88: Bottom Pin Number "2" at 762.82,1058.1 h25 r180; Bottom Pin Number "1" at 792.34,1058.1 h25 r180
C89: Bottom Pin Number "2" at 763.49,1234 h25 r180; Bottom Pin Number "1" at 793.01,1234 h25 r180
C105: Bottom Pin Number "2" at 86.19,842.36 h25 r90; Bottom Pin Number "1" at 86.19,812.84 h25 r90
C106: Bottom Pin Number "2" at 54.89,1340.66 h25 r90; Bottom Pin Number "1" at 54.89,1311.14 h25 r90
C108: Bottom Pin Number "2" at 148.58,1290.59 h25 r90; Bottom Pin Number "1" at 148.58,1261.07 h25 r90
C109: Bottom Pin Number "2" at 298.93,1319.75 h25 r90; Bottom Pin Number "1" at 298.93,1290.23 h25 r90
C110: Bottom Pin Number "2" at 242.89,1323.14 h25 r270; Bottom Pin Number "1" at 242.89,1352.66 h25 r270
C111: Bottom Pin Number "2" at 343,1199.41 h25 r90; Bottom Pin Number "1" at 343,1169.89 h25 r90
C112: Bottom Pin Number "2" at 361.99,1434.05 h25; Bottom Pin Number "1" at 332.47,1434.05 h25
C113: Bottom Pin Number "2" at 460.89,1265.66 h25 r90; Bottom Pin Number "1" at 460.89,1236.14 h25 r90
C115: Bottom Pin Number "2" at 241.39,989.14 h25 r270; Bottom Pin Number "1" at 241.39,1018.66 h25 r270
C117: Bottom Pin Number "2" at 410.65,1132.9 h25; Bottom Pin Number "1" at 381.13,1132.9 h25
C118: Bottom Pin Number "2" at 346.54,1255.92 h25 r270; Bottom Pin Number "1" at 346.54,1285.44 h25 r270
C119: Bottom Pin Number "2" at 462.5,1101.45 h25 r270; Bottom Pin Number "1" at 462.5,1130.97 h25 r270
C130: Bottom Pin Number "2" at 1694.3,1258.95 h25 r90; Bottom Pin Number "1" at 1694.3,1229.43 h25 r90
C139: Bottom Designator "1" at 1916,1720.76 h25 r90; Bottom Designator "2" at 1916,1691.24 h25 r90
C234: Bottom Pin Number "2" at 1042.67,1173.08 h25 r180; Bottom Pin Number "1" at 1072.19,1173.08 h25 r180
C247: Bottom Pin Number "2" at 952.67,1189.1 h25 r90; Bottom Pin Number "1" at 952.67,1159.58 h25 r90
C260: Bottom Pin Number "2" at 520,209.76 h25 r90; Bottom Pin Number "1" at 520,180.24 h25 r90
C265: Bottom Pin Number "2" at 979.99,873.86 h25; Bottom Pin Number "1" at 950.47,873.86 h25
C266: Bottom Pin Number "2" at 80,1024.76 h25 r90; Bottom Pin Number "1" at 80,995.24 h25 r90
C275: Top Pin Number "1" at 625,554 h10 r90; Top Pin Number "2" at 625,494 h10 r90
C279: Top Pin Number "2" at 380,589 h10 r90; Top Pin Number "1" at 380,649 h10 r90
C281: Top Pin Number "2" at 619,360 h10; Top Pin Number "1" at 679,360 h10
C283: Top Pin Number "2" at 476,647 h10; Top Pin Number "1" at 536,647 h10
C285: Top Pin Number "2" at 685,494 h10 r90; Top Pin Number "1" at 685,554 h10 r90
C287: Top Pin Number "2" at 476,702 h10; Top Pin Number "1" at 536,702 h10
C295: Top Pin Number "2" at 619,440 h10; Top Pin Number "1" at 679,440 h10
C301: Top Pin Number "2" at 355,206 h10 r270; Top Pin Number "1" at 355,146 h10 r270
C303: Top Pin Number "2" at 685,316 h10 r270; Top Pin Number "1" at 685,256 h10 r270
C304: Top Pin Number "2" at 625,316 h10 r270; Top Pin Number "1" at 625,256 h10 r270
C306: Top Pin Number "2" at 365,259 h10 r90; Top Pin Number "1" at 365,319 h10 r90
C307: Top Pin Number "2" at 285,259 h10 r90; Top Pin Number "1" at 285,319 h10 r90
C311: Top Pin Number "2" at 409,165 h10; Top Pin Number "1" at 469,165 h10
C312: Top Pin Number "2" at 409,110 h10; Top Pin Number "1" at 469,110 h10
C316: Top Pin Number "2" at 429,560 h10; Top Pin Number "1" at 489,560 h10
C317: Top Pin Number "2" at 276,158 h10 r180; Top Pin Number "1" at 216,158 h10 r180
C324: Top Pin Number "2" at 371,715 h10 r180; Top Pin Number "1" at 311,715 h10 r180
C365: Top Pin Number "2" at 171,609 h10; Top Pin Number "1" at 231,609 h10
C401: Top Pin Number "2" at 889,505 h10; Top Pin Number "1" at 949,505 h10
C402: Top Pin Number "2" at 889,450 h10; Top Pin Number "1" at 949,450 h10
C403: Top Pin Number "2" at 994,450 h10; Top Pin Number "1" at 1054,450 h10
C404: Top Pin Number "2" at 1114.35,77.17 h10 r90; Top Pin Number "1" at 1114.35,137.17 h10 r90